# Altium PCB PCB.PcbDoc (part 2 of 2)
Units mm, origin at the board's own origin, x right, y up, seen from the top; angles counter-clockwise.
Board outline 117.79 x 36.02 mm, 4 copper layers (Top Layer, Layer 1, Layer 2, Bottom Layer), stack 1.592 mm thick; 89 components, 67 nets, 364 pads, 204 vias.
Unrouted connection lines stored in the file: 24.
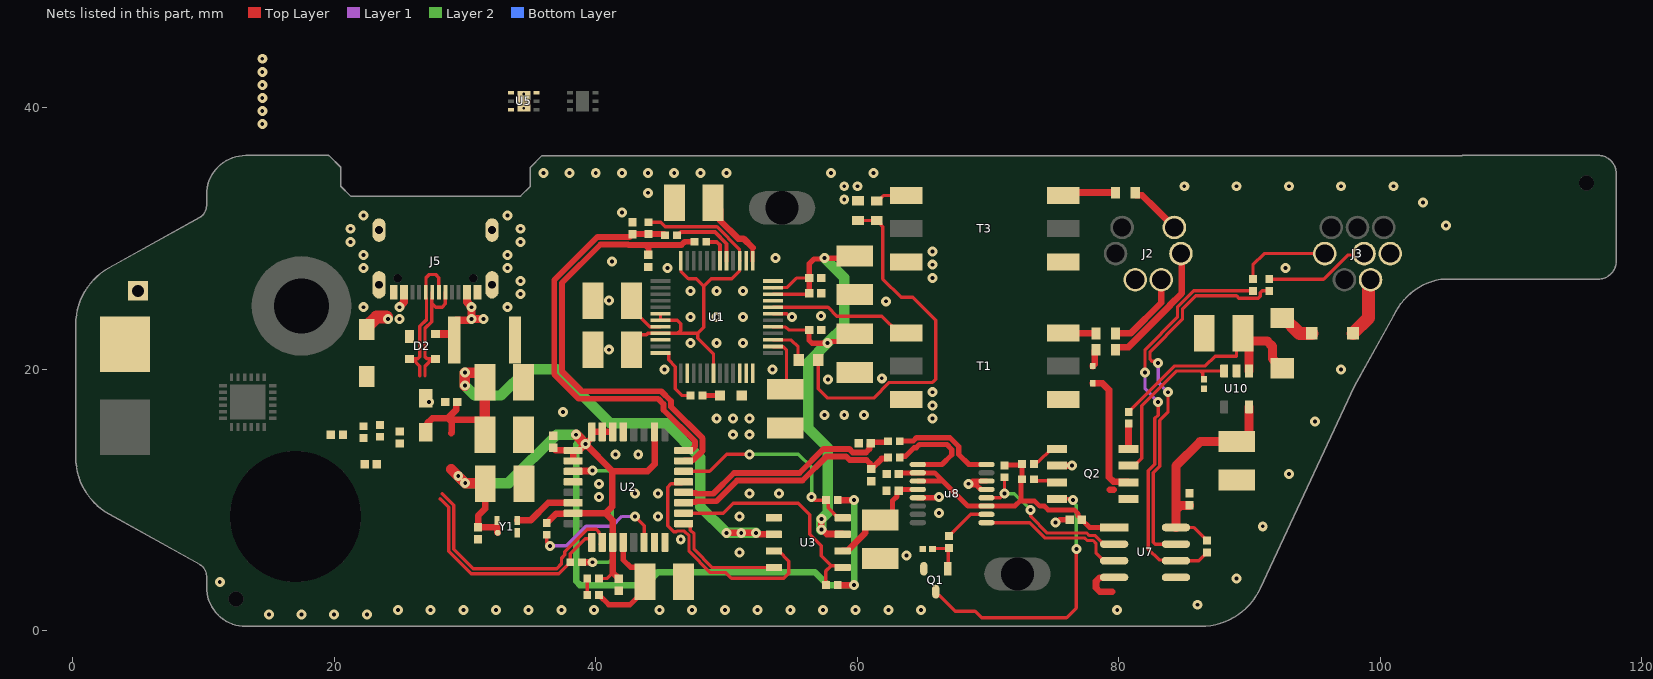
[diagram p4: the nets of this part, all layers, seen from the top]

## Via types
v1: diameter 0.762, hole 0.3, Top Layer to Bottom Layer, tented both sides, 200 vias
v2: diameter 0.5, hole 0.2, Top Layer to Bottom Layer, 4 vias

## Nets (pads, with @x,y where several pads share a name; then routed paths per layer and width w, separated by ;. In a path a pad name is that pad's centre, name@x,y a point inside that pad or via, vN(x,y) a via of type N, cw(c..) or ccw(c..) an arc to the next point about the centre after c; other vN are vias at no path point)
3V3: C11.2 R1.2 U1.6 U1.7 U1.9 U1.18 U1.39 U1.48 | length 30.9
  Top Layer w0.254: C11.2@42.725,21.5 42.725,21.973 43.398,22.646 43.881,22.646 43.985,22.75 U1.9@44.95,22.75 46.25,22.75 ; R1.2@44.025,31.242 44.974,31.242 45.312,30.904 49.271,30.904 50.987,29.188 50.987,28.313 U1.39@51,28.3 ; U1.6@44.95,24.25 U1.7@44.95,23.75 46.25,23.75 46.5,23.5 46.5,23 46.25,22.75 ; 46.513,27.502 47.088,26.927 47.675,26.927 48.25,26.351 ; U1.18@49,19.7 49,21.184 47.801,22.383 47.801,22.75 ; 50.987,27.502 50.412,26.927 48.825,26.927 48.25,26.351 ; 46.25,22.75 47.801,22.75 ; 47.801,22.75 48.25,23.199 48.25,26.351
  Top Layer w0.508: C11.2@42.725,20.9 C11.2@42.725,21.5
3V3_ISO: C28.1 C35.1 R35.2 U7.8 U10.5 | length 17.4
  Top Layer w0.254: U7.8@84.364,7.905 85.745,7.905 R35.2@86.75,6.9
  Top Layer w0.7: U7.8@84.364,7.905 84.364,9.25 ; C35.1@85.4,9.598 84.711,9.598 84.364,9.25 ; U10.5@89.95,17.125 89.95,14.925 89.5,14.475 C28.1@89,14.475 86.225,14.475 84.364,12.614 84.364,9.25
3V3_S: C21.2 C34.1 R29.1 R30.2 R36.2 U7.1 u8.3 u8.10 u8.11 | length 24.8
  Top Layer w0.381: C21.2@63.17,12 63.254,12.084 64.621,12.084 u8.10@64.625,12.087 65.912,12.087 66.547,11.452 ; u8.11@64.625,11.452 66.547,11.452 ; R36.2@71.25,12.65 71.3,12.7 72.55,12.7 R29.1@72.6,12.75 72.601,12.749 72.601,11.594 72.5,11.493 72.5,10 ; U7.1@79.636,7.905 77.765,7.905 C34.1@77.17,8.5 76.888,8.782 76.888,8.952 76.581,9.259 74.592,9.259 74.313,9.538 73.95,9.538 73.539,9.948 72.552,9.948 72.5,10 ; 66.547,11.452 68.452,9.547 u8.3@69.875,9.547 72.047,9.547 72.5,10
AF_GND: C27.2 C28.2 C35.2 J2.2 J3.3 Q2.5 R37.1 T1.4 T3.4 U7.5 U10.2 | length 0.8
  Top Layer w0.508: T1.4@75.75,17.71 T1.4@75.77,17.69 ; 79.321,10.781 79.589,10.781 ; Q2.5@80.275,10.095 Q2.5@80.73,10.095
  other v1: 86,2 89,4 91,8 93,12 95,16 97,20 92.75,27.75 105,31 103.25,32.75 85,34 89,34 93,34 97,34 101,34
AUD_GND: R13.2 T1.3 T3.3 U1.31 | length 2
  Top Layer w0.254: U1.31@53.55,24.25 54.617,24.25 54.867,24 v1(55,24) ; T1.3@63.461,17.421 T1.3@63.75,17.71
  other v1: 65.75,16.25 65.75,17.25 65.75,18.25 65.75,27 65.75,28 65.75,29 59,33 59,34 60,34
AUD_R: T1.1 U1.32 | length 11
  Top Layer w0.254: U1.32@53.563,24.737 57.763,24.737 58.435,24.065 61.875,24.065 63.15,22.79 T1.1@63.75,22.79
CLK: U2.30 Y1.3 | length 4.8
  Top Layer w0.5: Y1.3@34,8.45 35.013,8.45 36.363,9.8 U2.30@38.275,9.8
GND: C1.1 C2.2 C3.1 C4.2 C5.2 C6.1 C7.1 C8.1 C9.2 C10.1 C11.1 C12.1 C13.2 C14.1 C15.1 C16.2 C17.2 C18.1 C19.1 C20.1 C21.1 C23.2 C24.1 C25.1 C26.2 C29.2 C30.2 C33.2 C34.2 D2.1 D3.1 J5.A1/B12 J5.A12/B1 J5.Shell Q1.2 Q2.2 R32.1 U1.10 U1.14 U1.22 U1.23 U1.24 U1.33 U1.36 U1.38 U2.7 U2.8 U2.21 U2.28 U3.1 U5.3 U5.7 U7.4 u8.5 u8.6 u8.13 Y1.2 | length 10
  Top Layer w0.4: u8.13@64.625,10.182 66.182,10.182 v1(66.25,10.25) ; v1(68.5,11.25) 68.569,11.181 69.087,11.181 69.45,10.817 u8.5@69.875,10.817 ; v1@68.8,11.452 u8.6@69.875,11.452 ; v1(75.146,8.294) 75.244,8.294 75.45,8.5 C34.2@76.25,8.5
  Top Layer w0.5: 79.5,3 78.543,3 78.25,3.293 78.25,3.786 78.543,4.079 79.621,4.079 U7.4@79.636,4.095
  Top Layer w0.508: Q2.2@75.27,12.635 75.276,12.641 76.412,12.641 v1(76.418,12.647)
  other v1: 15,1.25 17.5,1.25 20,1.25 22.5,1.25 24.873,1.61 27.373,1.61 29.873,1.61 32.373,1.61 34.873,1.61 37.373,1.61 39.873,1.61 44.873,1.61 47.373,1.61 49.873,1.61 52.373,1.61 54.873,1.61 57.373,1.61 59.873,1.61 62.373,1.61 64.873,1.61 79.873,1.61 11.25,3.75 63.75,5.75 51,6 46.5,7 44.75,8.75 51,8.75 66.25,9 40.25,10.25 43,10.5 44.75,10.5 51.75,10.5 54,10.5 40.25,11.25 41.5,13.5 43.25,13.5 50.5,15 51.75,15 49.25,16.25 50.5,16.25 51.75,16.25 57.5,16.5 59,16.5 60.5,16.5 37.5,16.75 27.25,17.5 57.753,19.215 61.871,19.316 45.25,20 53.5,20 41,21.5 47.25,22 49.25,22 51.25,22 47.25,24 49.25,24 51.25,24 57.226,24.092 22.25,24.75 33.25,24.75 62.191,25.205 41,25.25 34.25,25.75 47.25,26 49.25,26 51.25,26 34.25,26.75 22.25,27.75 33.25,27.75 45.5,27.75 41.25,28.25 53.75,28.5 22.25,28.75 33.25,28.75 21.25,29.75 34.25,29.75 21.25,30.75 34.25,30.75 22.25,31.75 33.25,31.75 42,32 44,33.5 36,35 38,35 40,35 42,35 44,35 46,35 48,35 50,35 58,35 61.25,35 14.5,38.75 14.5,39.75 14.5,40.75 14.5,41.75 14.5,42.75 14.5,43.75
  other v2: 34.5,39.95 34.5,41.05
LINEIN: R11.2 T3.1 | length 2.9
  Top Layer w0.254: R11.2@61.481,32.871 61.581,32.871 62,33.29 T3.1@63.75,33.29 T3.1@63.46,33
NetC1_2: C1.2 D2.4 FB1.1 FB3.1 J5.A4/B9 J5.A9/B4 | length 10
  Top Layer w0.6: v1(25,24.75) 25,24.794 25.35,25.144 J5.A9/B4@25.35,25.895 ; D2.4@27.75,22.7 28.998,22.7 29.175,22.877 29.175,23.575 29.352,23.752 30.358,23.752 30.457,23.85 v1(30.5,23.85) ; J5.A4/B9@30.15,25.895 30.15,25.144 30.5,24.794 v1(30.5,24.75) v1(30.5,23.85) ; v1(31.4,23.85) v1(30.5,23.85)
  Top Layer w1: FB1.1@22.5,23.05 22.5,23.25 23.25,24 v1@24,24
  other v1: 24.1,23.85 25,23.85
NetC6_2: C6.2 U1.26 | length 4.4
  Top Layer w0.254: U1.26@53.55,21.75 53.563,21.737 54.348,21.737 54.579,21.506 54.579,19.146 C6.2@55.25,18.475
NetC9_1: C9.1 U1.37 | length 5.9
  Top Layer w0.3: U1.37@52,28.3 52,29.293
  Top Layer w0.5: C9.1@48.975,32.75 49.525,32.2 49.525,31.367 50.892,30 51.293,30 52,29.293
NetC10_2: C10.2 U1.8 | length 3.9
  Top Layer w0.254: C10.2@42.725,25.25 42.725,24.65 44.112,23.263 44.937,23.263 U1.8@44.95,23.25
  Top Layer w0.381: C10.2@42.725,25.25 C10.2@42.725,25.75
NetC13_1: C13.1 C14.2 C15.2 FB3.2 | length 50.3
  Top Layer w0.5: FB3.2@27,14.96 27.1,15.06 27.1,15.85 27.5,16.25 28.707,16.25 ; 28.95,15.125 29,15.175 29,15.957 28.807,16.15 ; C13.1@29.42,17.5 29.35,17.43 29.35,16.93 28.707,16.287 28.707,16.25 ; C15.2@31.525,15.6 30.975,16.15 28.807,16.15 ; v1(50,7.5) v1(51.125,7.5) v1(52.25,7.5) 52.365,7.385 53.625,7.385 ; 28.707,16.25 28.807,16.15
  Top Layer w0.8: v1(30,18.75) v1(30,19.75) 31.125,19.75 31.525,19.35 C14.2@31.525,19 C15.2@31.525,15.6
  Layer 2 w0.8: v1(30,19.75) v1(30,18.75) 30.75,18 32.75,18 34.75,20 37,20 41.125,15.875 45.375,15.875 48,13.25 48,9.5 v1(50,7.5) v1(51.125,7.5) v1(52.25,7.5)
NetC22_1: C22.1 R11.1 R13.1 | length 28.2
  Top Layer w0.254: C22.1@57.012,20.714 57.012,18.512 57.723,17.802 61.255,17.802 62.453,19 65.75,19 66,19.25 66,23.75 64.25,25.5 63.344,25.5 61.938,26.906 61.938,30.915 61.804,31.048 61.804,31.148 61.581,31.371 R11.1@61.481,31.371 61.381,31.371 61.371,31.381 60.07,31.381 R13.1@60.06,31.391 R13.1@59.96,31.391
NetC22_2: C22.2 U1.27 | length 3.1
  Top Layer w0.254: U1.27@53.563,22.237 54.948,22.237 55.465,21.72 55.465,20.762 C22.2@55.512,20.714
NetC24_2: C24.2 R12.2 U2.4 | length 9.1
  Top Layer w0.4: R12.2@40.25,2.75 41,2 42.625,2 43.952,3.327 43.952,4.097 43.175,4.874 42.651,4.874 42.1,5.425 U2.4@42.1,6.775
NetD1_1: D1.1 Q2.6 | length 9.8
  Top Layer w0.508: D1.1@78,18.93 78.75,18.93 79.25,18.43 79.25,11.75 79.584,11.416 80.679,11.416 Q2.6@80.73,11.365
NetD1_2: D1.2 R26.1 | length 1.4
  Top Layer w0.508: D1.2@78,20.25 78.154,20.404 78.154,21.404 R26.1@78.25,21.5
NetD3_2: D3.2 R4.2 | length 1.3
  Top Layer w0.381: R4.2@48.15,18 D3.2@49.5,18
NetD4_1: D4.1 FB2.2 | length 2.8
  Top Layer w0.254: D4.1@94.75,22.725 D4.1@94.75,22.75
  Top Layer w1: FB2.2@92.5,23.926 92.626,23.926 93.802,22.75 D4.1@94.75,22.75
NetF1_1: F1.1 J6.1 | length 0.2
  Top Layer w1: F1.1@4,21.935 F1.1@4,22.15
NetQ1_1: Q1.1 R31.1 R32.2 | length 2.8
  Top Layer w0.254: R32.2@65.75,6.25 65.8,6.3 66.95,6.3 66.957,6.307 66.957,4.796 Q1.1@66.915,4.753
NetQ1_3: Q1.3 Q2.4 | length 21.6
  Top Layer w0.254: Q1.3@66,3 66,2.823 66.135,2.688 66.312,2.688 67.5,1.5 69,1.5 69.5,1 76,1 76.75,1.75 v1(76.75,6.25) ; Q2.4@75.27,10.095 76.405,10.095 v1(76.5,10)
  Layer 2 w0.254: v1@76.5,9.863 76.75,9.613 v1(76.75,6.25)
  Bottom Layer w0.254: v1@76.5,9.863 v1(76.5,10)
NetQ2_1: Q2.1 R29.2 | length 2.2
  Top Layer w0.254: R29.2@73.5,12.75 73.673,12.923 73.833,12.923 74.815,13.905 Q2.1@75.27,13.905
NetQ2_3: Q2.3 R30.1 | length 1.8
  Top Layer w0.254: R30.1@73.503,11.593 73.617,11.479 75.041,11.479 Q2.3@75.213,11.308
NetQ2_8: Q2.8 R23.1 | length 2
  Top Layer w0.508: Q2.8@80.73,13.905 80.74,13.915 80.74,15.84 R23.1@80.75,15.85
NetR2_2: R2.2 U1.41 | length 5.6
  Top Layer w0.3: R2.2@46.25,30.25 46.25,30.3 46.35,30.4 46.4,30.4 46.5,30.5 49.104,30.5 50,29.604 U1.41@50,28.3
NetR3_2: R3.2 U1.42 | length 1.8
  Top Layer w0.3: R3.2@48.45,29.75 49.25,29.75 49.5,29.5 U1.42@49.5,28.9
NetR4_1: R4.1 U1.12 | length 5
  Top Layer w0.254: U1.12@44.95,21.25 45.56,21.25 45.573,21.237 45.573,20.722 46.081,20.215 46.081,18.499 46.58,18 R4.1@47.25,18
NetR6_2: R6.2 U2.14 U3.8 | length 16.3
  Top Layer w0.261: U2.14@46.725,12.2 48.7,12.2 50,13.5 v1(51.75,13.5) ; v1(56.5,10.25) 56.75,10 R6.2@57.6,10 57.769,9.831 57.769,9.411 58.525,8.655 U3.8@58.875,8.655
  Layer 2 w0.261: v1(51.75,13.5) 55.5,13.5 56.5,12.5 v1(56.5,10.25)
NetR7_2: R7.2 U2.10 U3.5 | length 17.5
  Top Layer w0.261: U2.10@46.725,9 49.75,9 50.5,9.75 55.5,9.75 56.375,8.875 56.375,7.375 57.25,6.5 57.25,5.75 58.011,4.989 ; R7.2@57.6,3.5 57.6,4.579 58.011,4.989 ; U3.5@58.875,4.845 58.731,4.989 58.011,4.989
NetR9_1: R9.1 U2.6 | length 10.7
  Top Layer w0.254: R9.1@36.25,7.35 36.25,6.75 v1(36.5,6.5) ; v1(43,8.75) 43.7,8.05 U2.6@43.7,6.775
  Layer 1 w0.254: v1(36.5,6.5) 37.75,6.5 39.25,8 41.25,8 42,8.75 v1(43,8.75)
NetR10_2: R10.2 R12.1 | length 1.3
  Top Layer w0.254: R12.1@39.35,2.75 R10.2@39.35,4
NetR14_1: R14.1 U2.27 | length 12
  Top Layer w0.5: U2.27@38.275,12.2 38.3,12.225 39.725,12.225 v1(39.75,12.25) ; R14.1@38.95,5.25 v1(39.75,5.25)
  Layer 2 w0.254: v1(39.75,5.25) 41,5.25 41.25,5.5 41.25,12 41,12.25 v1(39.75,12.25)
NetR24_1: R24.1 T1.6 | length 2.6
  Top Layer w0.254: R24.1@78.25,22.75 R24.1@78.25,22.85
  Top Layer w0.508: T1.6@75.75,22.79 75.77,22.77 78.23,22.77 R24.1@78.25,22.75
NetR25_1: R25.1 T3.6 | length 3.3
  Top Layer w0.508: T3.6@76.5,33.54 76.52,33.52 79.73,33.52 R25.1@79.75,33.5
NetR27_2: R27.2 u8.9 | length 7.9
  Top Layer w0.4: R27.2@63.25,13.25 63.35,13.35 63.683,13.35 64.333,14 64.5,14 64.75,14.25 66.848,14.25 67.223,13.875 67.223,13.473 66.473,12.722 u8.9@64.625,12.722
NetR28_2: R28.2 u8.8 | length 7.9
  Top Layer w0.4: R28.2@63.25,14.5 63.277,14.527 64.282,14.527 64.532,14.777 67.066,14.777 67.75,14.093 67.75,13.5 68.528,12.722 u8.8@69.875,12.722
NetR31_2: R31.2 u8.2 | length 3.6
  Top Layer w0.254: R31.2@67,7.25 68.662,8.912 u8.2@69.875,8.912
NetU2_9: U2.9 U3.4 | length 9.2
  Top Layer w0.254: U2.9@46.725,8.2 47.084,8.2 47.232,8.052 47.232,7.705 47.516,7.421 47.516,6.234 48.905,4.845 U3.4@53.625,4.845
NetU2_13: U2.13 U3.3 | length 18.6
  Top Layer w0.254: U2.13@46.725,11.4 46.577,11.252 45.752,11.252 45.5,11 45.5,8.034 45.963,7.571 46.173,7.571 46.237,7.635 46.763,7.635 47.135,7.263 47.135,6.076 48.747,4.464 49.934,4.464 50.374,4.024 54.383,4.024 54.75,4.391 54.75,5.34 53.975,6.115 U3.3@53.625,6.115
PTT_ISO: J2.3 R26.2 | length 10
  Top Layer w0.508: R26.2@79.75,21.5 79.75,21.6 79.846,21.696 80.744,21.696 83.88,24.832 83.88,24.88 84.811,25.811 84.811,28.785 J2.3@84.745,28.851
RX_TO_USB: R36.1 U7.2 u8.4 | length 13
  Top Layer w0.254: u8.4@69.875,10.182 70.932,10.182 v1(71.25,10.5) R36.1@71.25,11.75 ; v1(73.25,9.25) 73.25,8.75 74.521,7.479 77.563,7.479 77.748,7.293 78.185,7.293 78.843,6.635 U7.2@79.636,6.635
  Layer 2 w0.254: v1@71.262,10.488 72.012,10.488 v1(73.25,9.25)
  Bottom Layer w0.254: v1(71.25,10.5) v1@71.262,10.488
RX_To_USB_ISO: R34.1 U7.7 | length 29.4
  Top Layer w0.254: v1(83,20.5) 82.875,20.625 82.53,20.625 82.381,20.774 82.381,21.342 84.858,23.819 84.858,24.601 85.876,25.619 89,25.619 89.173,25.446 90.655,25.446 90.804,25.595 90.804,25.851 90.953,26 R34.1@91.5,26 ; v1(83.75,18.25) 83.75,16.711 83.131,16.092 83.131,12.592 82.631,12.092 82.631,6.784 82.78,6.635 U7.7@84.364,6.635
  Layer 1 w0.254: v1(83,20.5) 83,19 v1(83.75,18.25)
RXD_xfer: J3.5 R33.2 | length 6.9
  Top Layer w0.254: R33.2@90.25,26.9 90.25,28 91.101,28.851 J3.5@95.745,28.851
TX_From_USB: U7.3 u8.1 | length 11.4
  Top Layer w0.254: u8.1@69.875,8.277 73.184,8.277 74.363,7.098 77.405,7.098 77.591,6.912 78.027,6.912 78.244,6.695 78.244,5.963 78.843,5.365 U7.3@79.636,5.365
TX_From_USB_ISO: R33.1 R35.1 U7.6 | length 31.7
  Top Layer w0.254: v1(82,19.75) 82,21.5 84.477,23.977 84.477,24.759 85.718,26 R33.1@90.25,26 ; v1(83,17.5) 83,16.5 82.75,16.25 82.75,12.75 82.25,12.25 82.25,6.25 83.072,5.428 84.301,5.428 U7.6@84.364,5.365 86.115,5.365 R35.1@86.75,6
  Layer 1 w0.254: v1(82,19.75) 82,18.5 v1(83,17.5)
TXD_xfer: J3.4 R34.2 | length 8
  Top Layer w0.254: R34.2@91.5,26.9 95.65,26.9 97.488,28.738 J3.4@98.745,28.738
USB_1_D_N: C19.2 R27.1 U2.11 | length 18.1
  Top Layer w0.447: U2.11@46.725,9.8 46.777,9.852 47.623,9.852 47.684,9.913 49.225,9.913 50.812,11.5 55.812,11.5 57.656,13.344 59.14,13.344 59.415,13.069 60.702,13.069 60.964,12.807 60.964,12.472 C19.2@61.06,12.375 61.858,13.173 62.273,13.173 R27.1@62.35,13.25
USB_1_D_P: C20.2 R28.1 U2.12 | length 17.9
  Top Layer w0.447: U2.12@46.725,10.6 46.777,10.548 47.623,10.548 47.684,10.487 48.987,10.487 50.574,12.074 55.574,12.074 57.418,13.918 59.377,13.918 59.653,13.642 60.658,13.642 60.92,13.904 60.92,14.239 C20.2@61.017,14.336 ; C20.2@61.111,14.242 C20.2@61.017,14.336 ; R28.1@62.35,14.5 62.273,14.423 61.104,14.423 C20.2@61.017,14.336
USB_2_D_N: C12.2 R3.1 U2.15 | length 35
  Top Layer w0.447: C12.2@44,28.75 44.049,28.799 44.049,29.238 43.787,29.5 ; U2.15@46.725,13 46.777,13.052 47.443,13.052 48.171,13.78 48.171,14.721 45.756,17.136 45.756,17.576 45.008,18.324 38.926,18.324 37.406,19.844 37.406,26.594 40.36,29.549 42.451,29.549 42.5,29.5 43.787,29.5 ; R3.1@47.55,29.75 46.796,29.75 46.546,29.5 43.787,29.5
USB_2_D_P: C7.2 R1.1 R2.1 U2.16 | length 31.5
  Top Layer w0.447: C7.2@42.638,30.172 42.589,30.123 40.123,30.123 36.832,26.832 36.832,19.607 38.688,17.75 44.771,17.75 45.182,17.338 45.182,16.898 47.597,14.483 47.597,14.113 47.336,13.852 46.777,13.852 U2.16@46.725,13.8 U2.16@46.777,13.748 ; C7.2@42.806,30.34 44.024,30.341 R1.1@44.025,30.342 45.208,30.342 R2.1@45.3,30.25
USB_3V3: C18.2 C23.1 C26.1 C30.1 R6.1 R7.1 R9.2 R10.1 U2.3 U2.18 U2.22 U2.23 U2.24 U2.25 U2.26 U2.31 U5.1 Y1.1 Y1.4 | length 93.4
  Top Layer w0.254: R10.1@40.25,4 40.85,4 41.3,4.45
  Top Layer w0.5: 28.95,12.175 28.95,12.375 ; C18.2@31.55,11.25 31.55,9.35 31,8.8 C30.1@31,7.92 32.37,7.92 32.45,8 32.45,7.55 Y1.1@32.5,7.5 ; R9.2@36.25,8.25 36.975,8.975 38.25,8.975 U2.31@38.275,9 40.75,9 ; C23.1@36.75,14 36.95,13.8 U2.25@38.275,13.8 ; U2.26@38.275,13 U2.25@38.275,13.8 ; U2.22@41.3,15.225 U2.23@40.5,15.225 U2.24@39.7,15.225 39.7,14.775 v1(39.212,14.288) ; C26.1@41.75,4 41.3,4.45 U2.3@41.3,6.775 41.3,8.45 40.75,9 ; U2.18@44.5,15.225 44.5,12.75 43.957,12.207 41.25,12.207 ; R7.1@58.5,3.5 v1(59.75,3.5) ; R6.1@58.5,10 v1(59.75,10) ; U2.25@38.275,13.8 38.725,13.8 v1(39.212,14.288) ; v1(39.212,14.288) 41.25,12.25 41.25,12.207 ; 40.75,9 41.25,9.5 41.25,12.207
  Top Layer w0.8: 28.95,12.375 v1(29.484,11.841) v1(30.019,11.306) 31.494,11.306 C18.2@31.55,11.25 ; v1(38.5,15) v1(39.212,14.288)
  Layer 2 w0.5: 38.856,14.644 38.5,14.287 38.5,3.793 38.793,3.5 43.75,3.5 44.75,4.5 56.75,4.5 57.75,3.5 v1(59.75,3.5) v1(59.75,10)
  Layer 2 w0.8: v1(29.484,11.841) v1(30.019,11.306) 33.356,11.306 33.356,11.356 37,15 v1(38.5,15) 38.856,14.644
USB_D_N: C17.1 R8.2 U2.2 | length 19.2
  Top Layer w0.261: 28.25,10.5 29.138,9.612 29.138,6.25 30.636,4.752 37.003,4.752 37.379,5.128 37.379,5.543 37.643,5.808 37.643,6.054 39.347,7.758 40.053,7.758 40.233,7.578 40.233,7.492 40.5,7.225 U2.2@40.5,6.775 U2.2@40.356,6.631
USB_D_P: C16.1 R5.2 R14.2 U2.1 | length 17.6
  Top Layer w0.261: 28.089,10.112 28.225,9.976 28.75,9.451 28.75,6.089 30.476,4.364 37.164,4.364 37.767,4.967 R14.2@38.05,5.25 38.05,5.911 39.186,7.048 39.556,7.048 39.7,6.903 U2.1@39.7,6.775
USB_EXT_D_N: D2.3 J5.A7 J5.B7 R8.1 | length 9.7
  Top Layer w0.261: 26.944,19.5 26.944,20.25 D2.3@27.495,20.8 ; 27.5,25 27.75,24.75 28.25,24.75 28.5,25 J5.B7@28.5,25.895 ; J5.A7@27.5,25.895 27.5,25.475 27.444,25.419 27.444,23.631 26.944,23.131 26.944,20.953 27.097,20.8 D2.3@27.495,20.8 ; D2.3@27.75,20.8 D2.3@27.495,20.8
USB_EXT_D_P: D2.2 J5.A6 J5.B6 R5.1 | length 11.2
  Top Layer w0.261: 26.556,19.5 26.556,20.237 D2.2@25.993,20.8 ; J5.A6@28,25.895 28,27 27.75,27.25 27.272,27.25 27.019,26.997 27.019,25.914 J5.B6@27,25.895 27,25.475 27.056,25.419 27.056,23.792 26.556,23.292 26.556,20.953 26.403,20.8 D2.2@25.993,20.8 ; D2.2@25.993,20.8 25.8,20.8 D2.2@25.75,20.8 D2.2@25.993,20.8
VBUS1: C25.2 C33.1 U3.6 u8.12 | length 8.7
  Top Layer w0.4: C33.1@61.75,8.475 62.1,8.475 62.7,9.075 62.7,9.95 63.035,10.285 63.035,10.602 C25.2@63.155,10.722 63.251,10.817 u8.12@64.625,10.817
  Top Layer w0.5: U3.6@58.9,6.14 U3.6@58.875,6.115 59.225,6.115 60.6,7.49 60.6,7.925 61.15,8.475 C33.1@61.75,8.475
VBUS2: C2.1 C3.2 C4.1 C5.1 C8.2 U1.29 U1.34 U1.35 U3.7 | length 44.2
  Top Layer w0.254: U1.29@53.55,23.25 53.563,23.237 54.513,23.237 54.741,23.009 C2.1@56.313,23.009 ; U1.34@53.55,25.75 C5.1@56.319,25.75 ; U1.35@53.55,26.25 53.556,26.256 54.62,26.256 55.343,26.98 C4.1@56.332,26.98
  Top Layer w0.4: C2.1@56.313,23.009 56.313,22.225 56.547,21.991 57.688,21.991 v1(57.721,22.024) 57.819,22.024 57.916,22.121 59.217,22.121 C8.2@59.817,22.721 ; C5.1@56.319,25.75 56.325,25.756 56.325,26.973 C4.1@56.332,26.98 56.332,28.082 56.681,28.431 57.431,28.431 v1(57.5,28.5) 58.617,28.5 58.699,28.582 C3.2@58.699,28.64
  Top Layer w0.5: v1@57.25,8.5 v1(57.25,7.75) 57.321,7.75 57.661,7.41 58.85,7.41 U3.7@58.875,7.385
  Layer 2 w0.8: v1(57.25,7.75) 57.25,8.535 v1(57.275,8.56) 57.75,9.035 57.75,14 56.25,15.5 56.25,20.553 v1(57.721,22.024) 59,23.303 59,27 v1(57.5,28.5)
VBUS_12V: FB1.2
VBUS_PROT: C29.1 U3.2 U5.6
VEXT: D4.2 J3.1 | length 4.7
  Top Layer w1: D4.2@97.9,22.75 99.092,23.942 99.092,26.698 J3.1@99.245,26.851
VEXT_EN: Q2.7 R37.2 U10.3 | length 13.4
  Top Layer w0.254: Q2.7@80.73,12.635 81.185,12.635 81.75,13.2 81.75,17.211 84.414,19.875 86.232,19.875 ; R37.2@86.5,19.25 86.402,19.348 86.402,19.705 86.232,19.875 ; U10.3@88.05,19.875 86.232,19.875
VEXT_PROT: C27.1 FB2.1 R23.2 U10.1 | length 18
  Top Layer w0.254: R23.2@80.75,16.75 84.256,20.256 86.613,20.256 87.357,21 89,21 89,21.477 89.683,22.16 C27.1@89.95,22.16
  Top Layer w0.7: U10.1@89.95,19.875 89.95,22.16 91.34,22.16 91.75,21.75 91.75,20.824 91.947,20.627 91.947,20.501 92.374,20.074 FB2.1@92.5,20.074
xfer_AFIN: J2.1 R24.2 | length 6.2
  Top Layer w0.508: R24.2@79.75,22.75 80.9,22.75 83.245,25.095 J2.1@83.245,26.851
xfer_AFOUT: J2.5 R25.2 | length 4.2
  Top Layer w0.508: R25.2@81.25,33.5 81.25,33.4 81.346,33.304 81.792,33.304 82.807,32.289 J2.5@84.245,30.851
pads on no net: F1.2 J2.4 J2.6 J3.2 J3.6 J3.7 J3.8 J4.1 J5.A5 J5.A8 J5.B5 J5.B8 J5.MH1 J5.MH2 T1.2 T1.5 T3.2 T3.5 U1.1 U1.2 U1.3 U1.4 U1.5 U1.11 U1.13 U1.15 U1.16 U1.17 U1.19 U1.20 U1.21 U1.25 U1.28 U1.30 U1.40 U1.43 U1.44 U1.45 U1.46 U1.47 U2.5 U2.17 U2.19 U2.20 U2.29 U2.32 U4.1 U4.2 U4.3 U4.4 U4.5 U4.6 U4.7 U5.2 U5.4 U5.5 U6.1 U6.2 U6.3 U6.4 U6.5 U6.6 U6.7 U6.8 U6.9 U6.10 U6.11 U6.12 U6.13 U6.14 U6.15 U6.16 U6.17 U6.18 U6.19 U6.20 U6.21 U6.22 U6.23 U6.24 U6.25 u8.7 u8.14 u8.15 u8.16 U10.4
copper on no net: | length 1
  Top Layer w2: 16.791,24.147 17.495,24.851
  other v1: 62.5,3 33,6.5 34,6.5 36.25,10.75 36.25,11.75 36.25,12.75 27,13.75 28,13.75 29,13.75 36,15.75 36,16.75 36,17.75 36,18.75 24,36.5 25,36.5 26,36.5 27,36.5 23.25,37 27.75,37 23.25,38 27.75,38 23.5,39 24.5,39 25.5,39 26.5,39 27.5,39 17,39.25 18,39.25 19,39.25 20,39.25 21,39.25 16.75,40.25 21.25,40.25 16.75,41.25 21.25,41.25 17.5,41.75 18.5,41.75 19.5,41.75 20.5,41.75
  other v2: 39,39.95 39,41.05

## Polygon pours and split planes (outlines as drawn)
NetC1_2 on Top Layer "NETC1_2_L01_P026" (solid, pour order 26): 26,25 25.75,25.25 24.75,25.25 23.5,24 23.5,23.25 23.75,23 25,23 26,24
NetC1_2 on Top Layer "NETC1_2_L01_P025" (solid, remove dead copper, pour order 25): 28.644,25.144 27.75,24.25 27.75,21.5 28.75,20.5 31,20.5 32.5,22 32.5,24 31.356,25.144
AF_GND on Top Layer "AF_GND_L01_P017" (solid, remove dead copper, pour order 17): 73.5,16.234 74.265,15.469 76.989,15.469 77.735,14.723 77.735,9.965 78.669,9.031 80.969,9.031 82.017,7.983 82.017,2 82.017,0.165 93.415,0.165 119.5,26.25 119.5,37 73.5,37
GND on Top Layer "NONET_L01_P023" (solid, shelved, pour order 23): 22.25,33.5 22.25,26 24.25,24 24.25,19.25 23.75,18.75 23.75,0.25 80.5,0.25 80.75,0.5 80.75,6.791 79.636,7.905 78.595,7.905 76.5,10 76.5,14 76,14.5 73.5,14.5 72.75,15.25 68.5,15.25 67.25,16.5 67.25,36.5 24.75,36.5 24.25,36
AUD_GND on Top Layer "AUD_GND_L01_P022" (solid, pour order 22): 63.274,19.125 62.505,18.356 62.505,16.004 63.731,14.777 65.799,14.777 66.75,15.728 66.75,18.25 65.875,19.125
AUD_GND on Top Layer "AUD_GND_L01_P021" (solid, pour order 21): 62.499,28.86 63.135,29.497 66.503,29.497 66.75,29.25 66.75,26.5 66.5,26.25 63.75,26.25 62.503,27.497 62.503,27.562
AUD_GND on Top Layer "AUD_GND_L01_P020" (solid, pour order 20): 59,35.25 61,35.25 61.791,34.459 61.791,32.451 60.721,31.381 60.602,31.5 59,31.5 58,32.5 58,34.25
GND on Top Layer "NONET_L01_P001" (solid, remove dead copper, shelved, pour order 1): 6.031,0 18.75,12.719 18.75,19.25 19.5,20 22,22.5 22,28.75 22,36.5 65,36.5 65,18.75 62.75,16.5 62.75,0
no net on Bottom Layer "NONET_L04_P016" (solid, pour order 16): 9,32.25 13,28.25 17,28.25 18.5,26.75 18.5,19.75 18,19.25 18,13 13.5,8.5 12.5,8.5 8.75,4.75 6,4.75 0,10.75 0,27.5 0.25,27.5 5,32.25
GND on Bottom Layer "NONET_L04_P002" (solid, remove dead copper, shelved, pour order 2): 10.238,5.075 11.106,5.075 18.75,12.719 18.75,19.25 22,22.5 22,37 65,37 65,18.75 62.75,16.5 62.75,0 10.238,0
GND on Layer 1 "NONET_L02_P024" (solid, shelved, pour order 24): 22.5,36.5 22.254,36.254 22.254,25.996 24.25,24 24.25,19.25 23.75,18.75 23.75,0.5 80.75,0.5 80.75,7 79.75,8 78,8 77.75,8.25 77.75,9 76.937,9.813 76.937,13.195 75.882,14.25 73.75,14.25 72.75,15.25 68.494,15.25 67.25,16.494 67.25,36.25
AUD_GND on Layer 1 "AUD_GND_L02_P019" (solid, pour order 19): 63,29.25 60.75,31.5 59,31.5 58,32.5 58,34.25 59,35.25 61,35.25 63.75,32.5 64.5,32.5 66.75,30.25 66.75,29.75 63.5,29.75
AUD_GND on Layer 1 "AUD_GND_L02_P018" (solid, pour order 18): 66.75,29.75 66.75,16.25 65.5,15 63.5,15 62.25,16.25 62.5,16.5 62.5,22.5 62,23 54.5,23 54,23.5 54,24.75 54.25,25 60.75,25 63,27.25 63,29.25 63.75,30 66.5,30
AF_GND on Layer 2 "AF_GND_L03_P000" (solid, remove dead copper, pour order 0): 73.5,16.234 74.265,15.469 76.989,15.469 77.735,14.723 77.735,9.965 78.669,9.031 80.969,9.031 82.017,7.983 82.017,2 82.017,0.165 92.665,0.165 119,26.5 119,37 73.5,37

## Silkscreen, mask and mechanical layers (free items; w line width, h text height)
Top Overlay:
  lines w0.127: 52.975,29.851 cw(c52.975,32.351) 52.975,34.851 ; 55.515,29.851 ccw(c55.515,32.351) 55.515,34.851 ; 70.975,1.851 cw(c70.975,4.351) 70.975,6.851 ; 73.515,1.851 ccw(c73.515,4.351) 73.515,6.851
  text "JLCJLCJLCJLC" at 105.2,28.2 h1
Top Solder:
  text "FT-81x IF  / by DM6JM" at 94,2.75 h1.52
Top 3D Body:
  circle w0.013: c98.245,28.851 r7
  circle w0.013: c82.245,28.851 r7
Board Shape:
  lines w0.4: 19.601,36.351 20.5,35.451 20.5,34 21.25,33.25 23,33.25 32.5,33.25 34.25,33.25 35,34 35,35.451 35.899,36.351 106.245,36.351 106.251,36.357 ; 19.601,36.357 13.245,36.357 ccw(c13.245,33.351) 10.238,33.351 10.238,32.495 cw(c9.245,32.495) 9.727,31.626 2.813,27.785 ccw(c5.245,23.409) 0.238,23.409 0.238,13.293 ccw(c5.245,13.293) 2.813,8.916 9.727,5.075 cw(c9.244,4.207) 10.238,4.207 10.238,3.351 ccw(c13.245,3.351) 13.245,0.344 86.272,0.344 ccw(c86.272,5.351) 90.81,3.235 98.008,18.672 ; 98.002,18.675 100.996,24.094 cw(c105.522,21.984) 104.607,26.893 116.65,26.893 ccw(c116.65,28.274) 118.031,28.274 ; 106.307,36.351 106.363,36.351 ; 106.37,36.357 107.643,36.357 116.643,36.357 ; 116.643,36.364 cw(c116.643,34.983) 118.024,34.983 118.024,28.274